# Altium PCB CW342_PCB.PcbDoc (part 2 of 3)
Units mil, origin at the board's own origin, x right, y up, seen from the top; angles counter-clockwise.
Board outline 3740.34 x 4080.75 mil, 4 copper layers (Top Layer, Layer 2 (GND), Layer 3, Bottom Layer), stack 23.756 mil thick; 89 components, 152 nets, 1082 pads, 424 vias.
Unrouted connection lines stored in the file: 58.
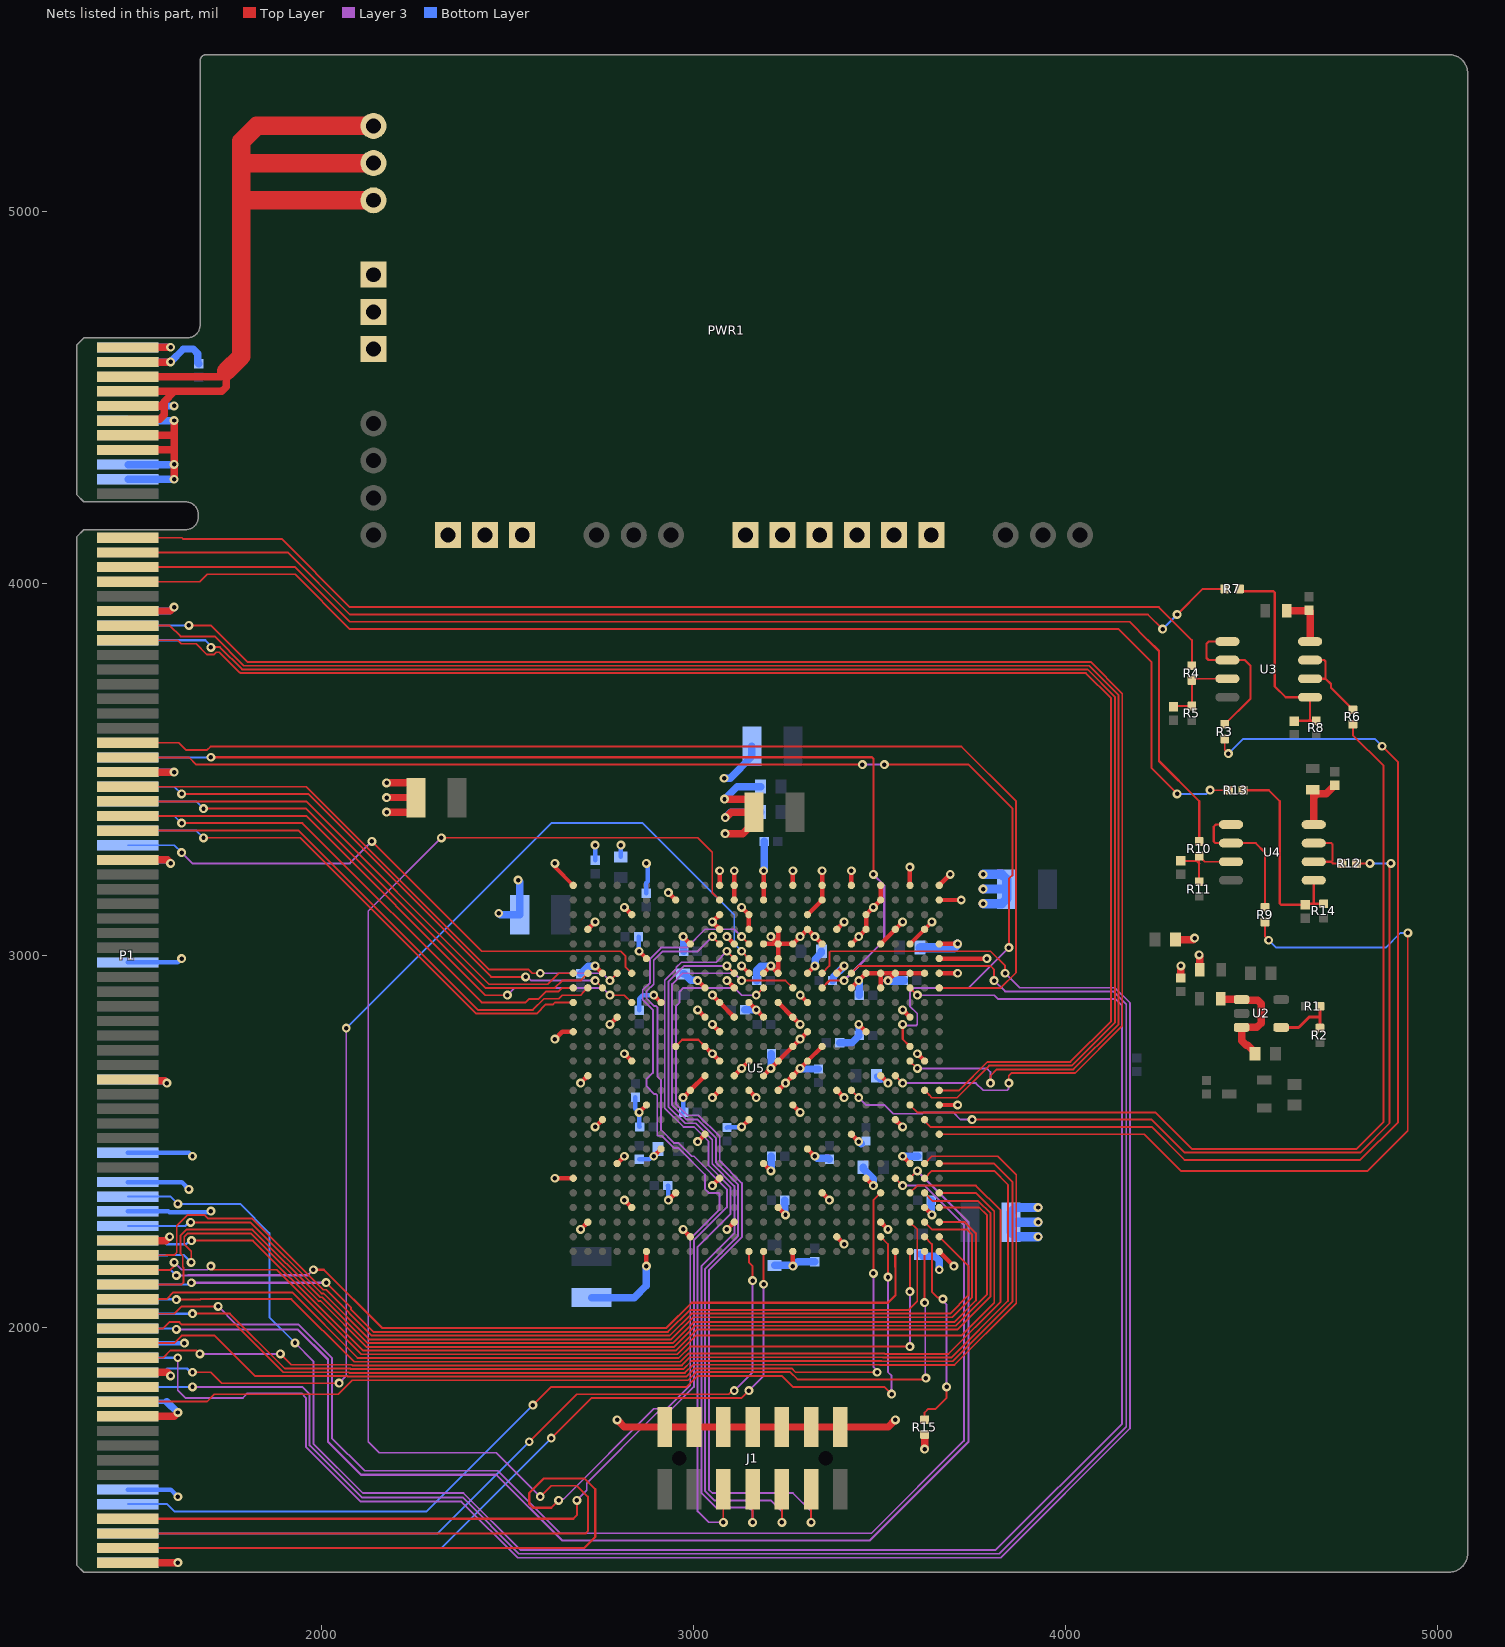
[diagram p4: the nets of this part, all layers, seen from the top]

## Via types
v1: diameter 24, hole 12, Top Layer to Bottom Layer, tented both sides, 423 vias
v2: diameter 24, hole 12, Top Layer to Bottom Layer, 1 vias

## Nets (pads, with @x,y where several pads share a name; then routed paths per layer and width w, separated by ;. In a path a pad name is that pad's centre, name@x,y a point inside that pad or via, vN(x,y) a via of type N, cw(c..) or ccw(c..) an arc to the next point about the centre after c; other vN are vias at no path point) (continued)
+5V: P1.B3 P1.B4 P1.B5 P1.B6 PWR1.1 PWR1.2 PWR1.3 | length 2584.5
  Top Layer w20: P1.B6@1480,4438.54 1483.78,4442.32 1565.61,4442.32 1577.33,4454.04 1577.33,4488.72 ; P1.B5@1480,4477.91 1480.09,4478 1481.09,4477 1565.61,4477 1577.33,4488.72 ; P1.B4@1480,4517.28 1605.08,4517.28 ; P1.B3@1480,4556.65 1729.65,4556.65 1744,4571 1744,4529 1732.28,4517.28 1605.08,4517.28 ; 1606.14,4517.28 1605.08,4517.28 ; 1577.33,4488.72 1577.33,4489.53 1605.08,4517.28
  Top Layer w50: 1744,4571 1785,4612 1785,5033 ; PWR1.3@2140,5031 1787,5031 1785,5033 ; PWR1.2@2140,5131 1792,5131 1785,5124 ; PWR1.1@2140,5231 1826.29,5231 1785,5189.71 1785,5124 ; 1785,5033 1785,5124
/USB_CE: P1.A81 U5.N26 | length 2235.4
  Top Layer w5: v1(2618.11,1702.76) 2725.91,1810.55 3129.45,1810.55 v1(3149.61,1830.71) ; v1(3188.98,2116.46) U5.N26@3188.98,2204.72
  Layer 3 w5: v1(3149.61,1830.71) 3188.98,1870.08 v1(3188.98,2116.46)
  Bottom Layer w5: P1.A81@1480,1407.05 2322.4,1407.05 v1(2618.11,1702.76)
/USB_RD: P1.A80 U5.P26 | length 2187.9
  Top Layer w5: v1(2559.06,1692.91) 2686.69,1820.55 3094.94,1820.55 3105.09,1830.71 v1(3110.24,1830.71) ; U5.P26@3149.61,2204.72 3149.61,2175.2 3159.45,2165.35 v1(3159.45,2126.3)
  Layer 3 w5: v1(3110.24,1830.71) 3159.45,1879.92 v1(3159.45,2126.3)
  Bottom Layer w5: P1.A80@1480,1446.42 2312.56,1446.42 v1(2559.06,1692.91)
AD0P: R6.2 U5.C16 | length 2455.6
  Top Layer w5: U5.C16@3582.68,2598.43 3602.36,2578.74 4242.13,2578.74 4340.55,2480.32 4783.46,2480.32 4856.02,2552.87 4856.02,3510.12 4773.62,3592.52 R6.2@4773.62,3622.05
AD1P: R3.2 U5.B17 | length 2871.7
  Top Layer w5: U5.B17@3622.05,2559.06 3622.05,2555.08 3637.76,2539.37 4232.28,2539.37 4320.87,2450.79 4793.31,2450.79 4895.02,2552.5 4895.02,3520.33 v1(4852.36,3562.99) ; R3.2@4429.13,3582.68 4429.13,3553.15 v1(4438.98,3543.31)
  Bottom Layer w5: v1(4438.98,3543.31) 4478.35,3582.68 4832.68,3582.68 v1(4852.36,3562.99)
AD3P: R12.2 U5.G15 | length 2344.1
  Top Layer w5: U5.G15@3425.2,2637.8 v1(3444.88,2618.11) ; v1(3750,2559.06) 4232.28,2559.06 4321.02,2470.32 4793.15,2470.32 4872.05,2549.21 4872.05,3244.56 v1(4875.52,3248.03) ; R12.2@4783.46,3248.03 v1(4819.52,3248.03)
  Layer 3 w5: v1(3444.88,2618.11) 3464.38,2598.61 3513.59,2598.61 3537.12,2575.08 3616.34,2575.08 3619.81,2578.56 3699.02,2578.56 3718.52,2559.06 v1(3750,2559.06)
  Bottom Layer w5: v1(4819.52,3248.03) v1(4875.52,3248.03)
AD8P: R9.2 U5.A18 | length 2328.7
  Top Layer w5: U5.A18@3661.42,2519.69 3750,2519.69 4212.6,2519.69 4311.02,2421.26 4812.99,2421.26 4921.26,2529.53 v1(4921.26,3061.02) ; R9.2@4537.4,3090.55 4537.4,3051.18 v1(4547.24,3041.34)
  Bottom Layer w5: v1(4547.24,3041.34) 4566.93,3021.65 4862.2,3021.65 4901.57,3061.02 v1(4921.26,3061.02)
CFG_CLK: P1.A57 U5.C8 | length 5184.1
  Top Layer w5: U5.C8@3582.68,2913.39 v1(3602.36,2893.7)
  Layer 3 w5: v1(1929.13,1958.66) 1978.5,1909.29 1978.5,1687.75 2111.14,1555.12 2381.89,1555.12 2535.01,1402 3813.42,1402 4153.23,1741.81 4153.23,2380.25 4153.23,2865.73 4135.1,2883.86 3818.9,2883.86 3809.06,2893.7 3639.78,2893.7 v1(3602.36,2893.7)
  Bottom Layer w5: P1.A57@1480,2351.93 1594.92,2351.93 v1(1614.17,2332.68) 1781.5,2332.68 1860.24,2253.94 1860.24,2027.56 v1(1929.13,1958.66)
CFG_D0: P1.A59 U5.B24 | length 2760.8
  Top Layer w5: v1(1648.19,2282.82) 1809.29,2282.82 2000.56,2091.55 2006,2091.55 2129.36,1968.19 2940.22,1968.19 2999.59,2027.56 3695.95,2027.56 3749.84,2081.45 3749.84,2249.26 3735.32,2263.78 3641.73,2263.78 U5.B24@3622.05,2283.46
  Bottom Layer w6: P1.A59@1480,2273.19 1633.69,2273.19 1643.32,2282.82 v1(1648.19,2282.82)
CFG_D1: P1.B61 U5.A25 | length 2716.1
  Top Layer w5: P1.B61@1480,2194.45 1582.04,2194.45 1582.29,2194.7 1604.15,2194.7 1611.32,2201.87 1611.32,2273.96 1639.68,2302.32 1685.85,2302.32 1694.68,2293.49 1812.76,2293.49 2004.7,2101.55 2012.63,2101.55 2135.98,1978.19 2936.07,1978.19 2995.44,2037.56 3691.1,2037.56 3739.84,2086.3 3739.84,2165.67 U5.A25@3661.42,2244.09
CFG_D2: P1.A60 U5.B22 | length 2933.5
  Top Layer w5: v1(1650.82,2233.82) 1815.86,2233.82 2016.58,2033.1 2017.72,2033.1 2112.63,1938.19 2952.64,1938.19 3009.16,1994.71 3710.03,1994.71 3799.37,2084.05 3799.37,2307.13 3766.33,2340.18 3644.08,2340.18 U5.B22@3622.05,2362.2
  Bottom Layer w6: P1.A60@1480,2233.82 1573.81,2233.82 1583.53,2224.09 1636.22,2224.09 1645.95,2233.82 v1(1650.82,2233.82)
CFG_D3: P1.B62 U5.A22 | length 2921.4
  Top Layer w5: P1.B62@1480,2155.08 1594.05,2155.08 1604.33,2165.35 v1(1604.33,2175.2) ; v1@1702.76,2155.51 1879.92,2155.51 2107.24,1928.19 2956.78,1928.19 3006.94,1978.35 3720.47,1978.35 3809.37,2067.24 3809.37,2312.68 3759.84,2362.2 U5.A22@3661.42,2362.2
  Layer 3 w5: v1(1604.33,2175.2) 1624.03,2155.5 1692.9,2155.5 v1(1702.76,2165.35)
CFG_D4: P1.A61 U5.A23 | length 2952.6
  Top Layer w5: v1(1650,2175) 1650,2204.82 1631.32,2223.5 1631.32,2243.9 1640.74,2253.32 1810.5,2253.32 1992.28,2071.55 1997.71,2071.55 2121.07,1948.19 2948.5,1948.19 3005.02,2004.71 3705.89,2004.71 3789.37,2088.19 3789.37,2302.99 3769.53,2322.83 U5.A23@3661.42,2322.83
  Bottom Layer w6: P1.A61@1480,2194.45 1585.77,2194.45 1586.52,2195.2 1629.8,2195.2 v1(1650,2175)
CFG_D5: P1.B63 U5.A24 | length 2892.3
  Top Layer w5: P1.B63@1480,2115.71 1623.58,2115.71 1629.5,2121.63 1629.5,2161.34 1627.43,2163.41 1627.43,2192.83 1621.32,2198.94 1621.32,2248.04 1636.6,2263.32 1814.65,2263.32 1996.42,2081.55 2001.86,2081.55 2125.21,1958.19 2944.36,1958.19 3000.88,2014.71 3701.75,2014.71 3759.84,2072.8 3759.84,2253.94 3730.32,2283.46 U5.A24@3661.42,2283.46
CFG_D6: P1.A62 U5.D26 | length 2295.7
  Top Layer w6: v1(1978.35,2155.51) 2006.6,2155.51 2163.42,1998.69 2927.58,1998.69 2995.82,2066.93 3523.62,2066.93 3543.62,2086.93 3543.62,2162.82 3543.31,2163.13 U5.D26@3543.31,2204.72
  Layer 3 w6: v1(1610,2140) 1641.72,2140 1642.24,2140.52 1963.36,2140.52 v1(1978.35,2155.51)
  Bottom Layer w6: P1.A62@1480,2155.08 1594.92,2155.08 v1(1610,2140)
CFG_D7: P1.B64 U5.C26 | length 2451.8
  Top Layer w5: P1.B64@1480,2076.34 1583.76,2076.34 1601.92,2094.5 1921.25,2094.5 2097.56,1918.19 2960.93,1918.19 2991.56,1948.82 v1(3582.68,1948.82) ; v1(3582.68,2096.46) 3582.68,2125.98 U5.C26@3582.68,2204.72
  Layer 3 w5: v1(3582.68,1948.82) v1(3582.68,2096.46)
CFG_D8_A0: P1.A63 U5.C24 | length 2438.2
  Top Layer w5: v1(2012.78,2121.05) 2079.56,2054.27 2079.56,2048.76 2140.13,1988.19 2931.93,1988.19 2991.3,2047.56 3579.75,2047.56 3602.36,2070.17 3602.36,2263.78 U5.C24@3582.68,2283.46
  Layer 3 w6: v1@1650,2120 v1(1650.52,2120.52) 2012.26,2120.52 v1(2012.78,2121.05)
  Bottom Layer w6: P1.A63@1480,2115.71 1645.71,2115.71 v1@1650,2120
CFG_D9_A1: P1.B65 U5.D21 | length 3555.3
  Top Layer w5: P1.B65@1480,2036.97 1603.9,2036.97 1624.02,2057.09 v1(1722.44,2057.09) ; U5.D21@3543.31,2401.57 v1(3562.99,2381.89)
  Layer 3 w5: v1(1722.44,2057.09) 1771.65,2007.87 1938.61,2007.87 2028.22,1918.27 2028.22,1702.76 2116.14,1614.83 2474.82,1614.83 2642.8,1446.85 3479.25,1446.85 3727.81,1695.42 3727.81,2276.13 3622.05,2381.89 v1(3562.99,2381.89)
CFG_D10_A2: P1.A64 U5.C22 | length 3010
  Top Layer w5: v1(1610,2075) 1673.85,2075 1675.44,2076.59 1919.48,2076.59 2087.87,1908.19 2965.07,1908.19 2986.96,1930.08 3513.94,1930.08 3514.7,1929.32 3686.29,1929.32 3826.26,2069.28 3826.26,2315.48 3759.84,2381.89 3602.36,2381.89 U5.C22@3582.68,2362.2
  Bottom Layer w6: P1.A64@1480,2076.34 1608.66,2076.34 v1(1610,2075)
CFG_D11_A3: P1.B66 U5.B20 | length 3150.7
  Top Layer w5: P1.B66@1480,1997.6 1574.37,1997.6 1591.27,2014.5 1618.08,2014.5 1624.7,2007.87 1769.3,2007.87 1897.28,1879.89 2073.74,1879.89 2075.45,1878.19 2977.49,1878.19 2999.38,1900.08 3501.51,1900.08 3502.27,1899.32 3702.31,1899.32 3868.27,2065.28 3868.27,2411.26 3818.9,2460.63 3641.73,2460.63 U5.B20@3622.05,2440.94
CFG_D12_A4: P1.A65 U5.A20 | length 3055.5
  Top Layer w5: v1(1653.54,2037.4) 1753.92,2037.4 1901.43,1889.89 2077.89,1889.89 2079.59,1888.19 2973.35,1888.19 2995.24,1910.08 3505.66,1910.08 3506.42,1909.32 3698.17,1909.32 3858.27,2069.42 3858.27,2391.73 3809.06,2440.94 U5.A20@3661.42,2440.94
  Bottom Layer w6: P1.A65@1480,2036.97 1480.43,2037.4 v1(1653.54,2037.4)
CFG_D13_A5: P1.B67 U5.E22 | length 2575.8
  Top Layer w5: P1.B67@1480,1958.23 1604.19,1958.23 1624.31,1978.35 1712.75,1978.35 1821.2,1869.89 2069.6,1869.89 2071.31,1868.19 2981.64,1868.19 3003.53,1890.08 3264.74,1890.08 3274.9,1879.92 v1(3494.09,1879.92) ; v1(3484.25,2145.67) 3484.25,2342.52 U5.E22@3503.94,2362.2
  Layer 3 w5: v1(3484.25,2145.67) 3484.25,1894.91 3494.09,1885.06 v1(3494.09,1879.92)
CFG_D14_A6: P1.A66 U5.C21 | length 3549.2
  Top Layer w5: U5.C21@3582.68,2401.57 v1(3602.36,2421.26)
  Layer 3 w6: v1(1610,1995) 1936.64,1995 2017.72,1913.92 2017.72,1692.91 2106.3,1604.33 2470.47,1604.33 2647.64,1427.17 3474.41,1427.17 3740.16,1692.91 3740.16,2283.46 v1(3602.36,2421.26)
  Bottom Layer w6: P1.A66@1480,1997.6 1607.4,1997.6 v1(1610,1995)
CFG_D15_A7: P1.B68 U5.B21 | length 3023.6
  Top Layer w5: P1.B68@1480,1918.86 1574.37,1918.86 1593.87,1938.36 1664,1938.36 v1(1673.23,1929.13) ; v1(1889.76,1929.13) 1919,1899.89 2082.03,1899.89 2083.73,1898.19 2969.21,1898.19 2991.1,1920.08 3509.8,1920.08 3510.56,1919.32 3694.03,1919.32 3846.28,2071.57 3846.28,2383.88 3808.9,2421.26 3641.73,2421.26 U5.B21@3622.05,2401.57
  Layer 3 w5: v1(1673.23,1929.13) v1(1889.76,1929.13)
CFG_DONE: P1.A68 U5.J7 | length 5286.4
  Top Layer w5: U5.J7@3346.46,2952.76 3366.14,2972.44 3366.14,3008.88 3369.07,3011.81 3799.21,3011.81 3838.58,2972.44 v1(3838.58,2952.76)
  Layer 3 w5: v1(1613.86,1918.86) 1613.86,1878.29 1613.99,1878.16 1613.99,1830.89 1633.86,1811.02 1789.27,1811.02 1801.1,1822.86 1946.67,1822.86 1958.5,1811.02 1958.5,1678.93 2105.43,1532 2376.72,1532 2527.72,1381 3826.24,1381 4174.24,1729 4174.24,2873 4133.54,2913.7 3877.64,2913.7 v1(3838.58,2952.76)
  Bottom Layer w6: P1.A68@1480,1918.86 v1(1613.86,1918.86)
CFG_DOUT: P1.B70
CFG_EMCCLK: P1.B71 U5.B26 | length 2530.3
  Top Layer w5: P1.B71@1480,1800.75 1692.48,1800.75 1712.6,1820.87 2045.77,1820.87 2083.09,1858.19 2985.78,1858.19 3007.67,1880.08 3260.6,1880.08 3280.26,1860.42 3622.09,1860.42 v1(3625.59,1863.92) ; v1(3622.05,2066.93) 3622.05,2125.98 U5.B26@3622.05,2204.72
  Layer 3 w5: v1(3622.05,2066.93) 3623.82,2065.16 3623.82,1865.69 v1(3625.59,1863.92)
CFG_INITB: P1.A70 U5.G7 | length 5035.4
  Top Layer w5: U5.G7@3425.2,2952.76 3444.88,2972.44 3799.21,2972.44 3809.06,2962.6 v1(3809.06,2933.07)
  Layer 3 w5: v1(1653.54,1840.55) 1948.82,1840.55 1968.5,1820.87 1968.5,1683.07 2108.45,1543.13 2379.74,1543.13 2530.87,1392 3823.1,1392 4164.24,1733.14 4164.24,2868.86 4129.4,2903.7 3838.43,2903.7 v1(3809.06,2933.07)
  Bottom Layer w5: P1.A70@1480,1840.12 1653.11,1840.12 v1(1653.54,1840.55)
CFG_PGM: P1.A69 U5.P6 | length 3059.2
  Top Layer w5: v1(1653.54,1879.92) 1702.76,1879.92 1732.28,1850.39 v1(2047.72,1850.39) ; v1(3129.92,3011.81) U5.P6@3149.61,2992.13
  Layer 3 w5: v1(2047.72,1850.39) 2047.72,1850.87 2066.93,1870.08 v1(2066.93,2805.12)
  Bottom Layer w5: v1(2066.93,2805.12) 2618.11,3356.3 2864.17,3356.3 3110.24,3110.24 3110.24,3031.5 v1(3129.92,3011.81)
  Bottom Layer w6: P1.A69@1480,1879.49 1480.43,1879.92 1576.05,1879.92 1586.2,1890.08 1638.52,1890.08 1648.67,1879.92 v1(1653.54,1879.92)
CFG_PUDC: R15.1 U5.B25 | length 558.3
  Top Layer w5: R15.1@3622.05,1751.97 3622.05,1771.65 3631.89,1781.5 3651.57,1781.5 3681.1,1811.02 v1(3681.1,1840.55) ; U5.B25@3622.05,2244.09 3641.73,2224.41 3641.73,2096.46 3657.78,2080.41 3667.62,2080.41 v1(3671.26,2076.77)
  Layer 3 w5: v1(3671.26,2076.77) 3671.26,2071.63 3681.1,2061.79 v1(3681.1,1840.55)
CFG_RDWR: P1.A78 U5.E25 | length 2668.1
  Top Layer w5: v1(2568.9,1791.34) 2618.11,1840.55 2982.28,1840.55 3011.81,1870.08 3238.19,1870.08 3267.72,1840.55 3513.78,1840.55 v1(3533.46,1820.87) ; U5.E25@3503.94,2244.09 3523.62,2224.41 v1(3523.62,2135.83)
  Layer 3 w5: v1(3523.62,2135.83) 3523.62,1879.92 3533.46,1870.08 v1(3533.46,1820.87)
  Bottom Layer w5: P1.A78@1480,1525.16 1585.08,1525.16 1604.33,1505.91 2283.46,1505.91 v1(2568.9,1791.34)
CWIO_HS1: P1.A27 U5.J8 | length 2727.3
  Top Layer w6: v1(1702.76,3533.46) 2586.88,3533.46 2587.2,3533.78 3480.42,3533.78 3484.25,3529.95 v1(3484.25,3218.5) ; U5.J8@3346.46,2913.39 3366.14,2933.07 v1(3405.51,2933.07)
  Layer 3 w6: v1(3405.51,2933.07) 3513.78,3041.34 3513.78,3188.97 v1(3484.25,3218.5)
  Bottom Layer w6: P1.A27@1480,3533.03 1702.32,3533.03 v1(1702.76,3533.46)
CWIO_HS2: P1.B27 U5.C12 | length 3337.7
  Top Layer w5: P1.B27@1480,3533.03 1644.13,3533.03 1663.39,3513.78 v1(3454.72,3513.78) ; v1(3513.78,3513.78) 3740.16,3513.78 3858.11,3395.83 3858.11,3215.98 3848.61,3206.48 v1(3848.61,3021.5) v1@3848.61,3016.35
  Top Layer w6: v1(3562.99,2814.96) 3562.99,2775.59 U5.C12@3582.68,2755.91
  Layer 3 w5: v1(3454.72,3513.78) v1(3513.78,3513.78) ; v1(3562.99,2814.96) 3565.92,2812.03 3599.43,2812.03 3602.36,2814.96 3602.36,2844.49 3582.68,2864.17 3582.68,2901.59 3594.47,2913.39 3740.5,2913.39 v1(3848.61,3021.5)
CWIO_IO4: P1.B26 U5.A8 | length 3145.1
  Top Layer w5: P1.B26@1480,3572.4 1616.56,3572.4 1635.62,3553.33 1693.1,3553.33 1702.1,3562.33 3721.13,3562.33 3868.11,3415.35 3868.11,2954.71 3826.79,2913.39 U5.A8@3661.42,2913.39
FPGA_M0: P1.B79 U5.T5 | length 3210.3
  Top Layer w5: 2677.17,1485.79 2687.01,1495.63 v1(2687.01,1535.43)
  Top Layer w6: P1.B79@1480,1485.79 2677.17,1485.79 ; v1(3051.18,3051.18) U5.T5@3070.87,3031.5
  Layer 3 w5: v1(2687.01,1535.43) 2713.69,1562.11 2713.69,1581.8 2903.54,1771.65 2933.07,1771.65 3001.81,1840.39 3001.81,2234.17 3090.55,2322.91 3090.55,2372.05 3001.97,2460.63 2996.43,2460.63 2960.9,2496.16 2948.7,2496.16 2913.18,2531.69 2913.18,2649.38 2913.2,2665.56 2903.54,2675.21 2903.54,2861.24 2900.61,2864.17 2895.65,2864.17 2874.2,2885.62 2874.2,2903.73 2893.7,2923.23 2893.7,2987.83 2917.53,3011.65 3011.65,3011.65 v1(3051.18,3051.18)
FPGA_M1: P1.B80 U5.T2 | length 4594.5
  Top Layer w5: v1(2322.83,3316.93) 3011.81,3316.93 3051.18,3277.56 3051.18,3169.29 U5.T2@3070.87,3149.61 ; v1(2588.58,1545.28) 2618.11,1574.8 2687.01,1574.8 2716.54,1545.28 2716.54,1452.24 2710.71,1446.42
  Top Layer w6: P1.B80@1480,1446.42 2710.71,1446.42
  Layer 3 w5: v1(2322.83,3316.93) 2125.98,3120.08 2125.98,1692.91 2155.51,1663.39 2470.47,1663.39 v1(2588.58,1545.28)
FPGA_M2: P1.B81 U5.P5 | length 3821
  Top Layer w5: v1(3129.92,3051.18) U5.P5@3149.61,3031.5
  Top Layer w6: P1.B81@1499.69,1407.05 2706.69,1407.05 2736.22,1436.58 2736.22,1564.96 2706.69,1594.49 2598.43,1594.49 2559.06,1555.12 2559.06,1525.59 2568.9,1515.75 2618.11,1515.75 2634.35,1531.99 v1(2637.8,1535.43)
  Layer 3 w5: v1(2637.8,1535.43) 2641.43,1539.07 2651.27,1539.07 2893.86,1781.65 2928.93,1781.65 2991.81,1844.54 2991.81,2239.02 3070.87,2318.07 3070.87,2359.28 3067.94,2362.2 3041.34,2362.2 3031.5,2372.05 3031.5,2411.42 2959.64,2483.27 2947.45,2483.27 2914.97,2515.75 2903.18,2515.75 2903.18,2625.02 2900.25,2627.95 2895.65,2627.95 2874.02,2649.59 2874.02,2667.32 2891.51,2684.82 2891.51,2854.17 2864.17,2881.51 2864.17,2903.54 ; 2864.2,2903.57 2864.2,2907.87 2883.7,2927.37 2883.7,2991.97 2913.39,3021.65 2982.28,3021.65 3031.5,3070.87 3110.24,3070.87 v1(3129.92,3051.18)
GND: C1.2 C21.2 C22.2 C23.2 C24.2 C25.2 C26.2 C27.2 C28.2 C29.2 C30.2 C31.2 C32.2 C33.2 C34.2 C35.2 C36.2 C37.2 C38.2 C39.2 C40.2 C41.2 C42.2 C43.2 C44.2 C45.2 C46.2 C47.2 C48.2 C49.2 C50.2 C51.2 C52.2 C53.2 C54.2 C55.2 C56.2 C57.2 C58.2 C59.2 C60.2 C61.2 C62.2 C63.2 C70.2 C71.2 C72.2 C73.2 C74.2 C75.2 J1.1 J1.3 J1.5 J1.7 J1.9 J1.11 J1.13 L2.1 P1.A1 P1.A2 P1.A5 P1.A6 P1.A9 P1.A10 P1.A17 P1.A28 P1.A34 P1.A41 P1.A49 P1.A54 P1.A56 P1.A58 P1.A67 P1.A71 P1.A77 P1.A82 P1.B1 P1.B2 P1.B7 P1.B8 P1.B17 P1.B28 P1.B34 P1.B49 P1.B60 P1.B69 P1.B72 P1.B82 PWR1.4 PWR1.5 PWR1.6 PWR1.11 PWR1.12 PWR1.13 PWR1.17 PWR1.18 PWR1.19 PWR1.20 PWR1.21 PWR1.22 R15.2 U5.A1 U5.A2 U5.A5 U5.A6 U5.A7 U5.A16 U5.A26 U5.AA6 U5.AA16 U5.AA26 U5.AB3 U5.AB13 U5.AB23 U5.AC10 U5.AC20 U5.AD7 U5.AD17 U5.AE4 U5.AE14 U5.AE24 U5.AF1 U5.AF11 U5.AF21 U5.B4 U5.B7 U5.B13 U5.B23 U5.C1 U5.C5 U5.C7 U5.C10 U5.C20 U5.D4 U5.D7 U5.D17 U5.E1 U5.E2 U5.E5 U5.E7 U5.E8 U5.E14 U5.E24 U5.F3 U5.F4 U5.F7 U5.F11 U5.F21 U5.G1 U5.G5 U5.G8 U5.G18 U5.H4 U5.H7 U5.H15 U5.H25 U5.J1 U5.J2 U5.J5 U5.J12 U5.J22 U5.K3 U5.K4 U5.K7 U5.K9 U5.K11 U5.K13 U5.K19 U5.L1 U5.L5 U5.L10 U5.L12 U5.L14 U5.L16 U5.L26 U5.M4 U5.M5 U5.M6 U5.M7 U5.M9 U5.M13 U5.M15 U5.M23 U5.N1 U5.N2 U5.N5 U5.N7 U5.N10 U5.N14 U5.N20 U5.P3 U5.P4 U5.P7 U5.P9 U5.P13 U5.P15 U5.P17 U5.R1 U5.R2 U5.R5 U5.R8 U5.R10 U5.R14 U5.R24 U5.T1 U5.T3 U5.T4 U5.T9 U5.T11 U5.T13 U5.T15 U5.T21 U5.U8 U5.U10 U5.U12 U5.U14 U5.U18 U5.V5 U5.V15 U5.V25 U5.W2 U5.W12 U5.W22 U5.Y9 U5.Y19 | length 13324.7
  Top Layer w6: U5.W12@2952.76,2755.91 2970.6,2773.75 3013.65,2773.75 U5.U12@3031.5,2755.91
  Top Layer w10: v1(2627.95,3248.03) 2627.95,3238.19 U5.AF1@2677.17,3188.98 ; v1(3129.92,2972.44) U5.P7@3149.61,2952.76
  Top Layer w12: C43.2@2234.35,3464.57 C43.2@2253.94,3444.98 ; v1(2627.95,2401.57) U5.AF21@2677.17,2401.57 ; v1(2627.95,2775.59) 2647.64,2795.28 U5.AF11@2677.17,2795.28 ; v1(2696.85,2263.78) U5.AE24@2716.54,2283.46 ; v1(2696.85,2657.48) U5.AE14@2716.54,2677.17 ; U5.AE4@2716.54,3070.87 v1(2736.22,3090.55) ; v1(2736.22,2539.37) U5.AD17@2755.91,2559.06 ; v1(2736.22,2972.44) U5.AD7@2755.91,2952.76 ; v1(2775.59,2814.96) U5.AC10@2795.28,2834.65 ; U5.AC20@2795.28,2440.94 v1(2814.96,2460.63) ; v1(2814.96,2342.52) U5.AB23@2834.65,2322.83 ; v1(2814.96,2736.22) U5.AB13@2834.65,2716.54 ; v1(2814.96,3129.92) U5.AB3@2834.65,3110.24 ; v1(2854.33,2578.74) U5.AA16@2874.02,2598.43 ; v1(2854.33,3011.81) U5.AA6@2874.02,2992.13 ; v1(2874.02,2165.35) U5.AA26@2874.02,2204.72 ; v1(2893.7,2460.63) U5.Y19@2913.39,2480.32 ; v1(2893.7,2893.7) U5.Y9@2913.39,2874.02 ; v1(2933.07,2342.52) U5.W22@2952.76,2362.2 ; v1(2933.07,3169.29) U5.W2@2952.76,3149.61 ; v1(2972.44,2263.78) U5.V25@2992.13,2244.09 ; v1(2972.44,3051.18) U5.V5@2992.13,3031.5 ; v1(2972.68,2618.11) 2972.68,2618.23 2992.13,2637.68 U5.V15@2992.13,2637.8 U5.U14@3031.5,2677.17 ; v1(3011.81,2500) U5.U18@3031.5,2519.69 ; v1(3011.81,2854.33) U5.U10@3031.5,2834.65 ; v1(3011.81,2933.07) U5.U8@3031.5,2913.39 ; U5.U12@3031.5,2755.91 v1(3051.18,2736.22) U5.T13@3070.87,2716.54 ; v1(3051.18,2381.89) U5.T21@3070.87,2401.57 ; v1(3051.18,2618.11) U5.T15@3070.87,2637.8 ; v1(3051.18,2814.96) U5.T11@3070.87,2795.28 ; v1(3051.18,2893.7) U5.T9@3070.87,2874.02 U5.R10@3110.24,2834.65 ; U5.T4@3070.87,3070.87 v1(3051.18,3090.55) U5.T3@3070.87,3110.24 ; U5.T1@3070.87,3188.98 v1(3070.87,3228.35) ; v1(3090.55,2263.78) U5.R24@3110.24,2283.46 ; v1(3090.55,2933.07) U5.R8@3110.24,2913.39 ; v1(3090.55,3051.18) U5.R5@3110.24,3031.5 ; U5.R14@3110.24,2677.17 v1(3129.92,2696.85) U5.P13@3149.61,2716.54 ; U5.R2@3110.24,3149.61 v1(3110.24,3228.35) ; v1(3129.92,2539.37) U5.P17@3149.61,2559.06 ; v1(3129.92,3129.92) U5.P3@3149.61,3110.24 U5.P4@3149.61,3070.87 ; U5.P15@3149.61,2637.8 v1(3169.29,2618.11) ; U5.P9@3149.61,2874.02 v1(3169.29,2854.33) U5.N10@3188.98,2834.65 ; U5.N20@3188.98,2440.94 v1(3208.66,2421.26) ; U5.N14@3188.98,2677.17 v1(3208.66,2696.85) U5.M13@3228.35,2716.54 U5.L12@3267.72,2755.91 v1(3287.4,2775.59) U5.K11@3307.09,2795.28 ; U5.N7@3188.98,2952.76 v1(3208.66,2972.44) U5.M7@3228.35,2952.76 U5.M5@3228.35,3031.5 ; U5.N5@3188.98,3031.5 U5.M5@3228.35,3031.5 ; U5.N2@3188.98,3149.61 v1(3188.98,3228.35) ; v1(3208.66,3051.18) U5.M5@3228.35,3031.5 ; U5.M23@3228.35,2322.83 v1(3248.03,2303.15) ; U5.M15@3228.35,2637.8 v1(3248.03,2657.48) U5.L14@3267.72,2677.17 v1(3287.4,2696.85) U5.K13@3307.09,2716.54 U5.J12@3346.46,2755.91 ; U5.M9@3228.35,2874.02 U5.L10@3267.72,2834.65 v1(3287.4,2814.96) ; U5.M4@3228.35,3070.87 U5.M5@3228.35,3031.5 ; v1(3267.72,2165.35) U5.L26@3267.72,2204.72 ; U5.L16@3267.72,2598.43 v1(3287.4,2578.74) ; U5.L1@3267.72,3188.98 v1(3267.72,3228.35) ; v1(3287.72,2893.7) 3287.72,2893.54 3307.09,2874.17 U5.K9@3307.09,2874.02 ; U5.K19@3307.09,2480.32 v1(3326.77,2460.63) ; U5.K7@3307.09,2952.76 v1(3326.77,2972.44) ; U5.K3@3307.09,3110.24 U5.J2@3346.46,3149.61 v1(3346.46,3228.35) ; U5.J22@3346.46,2362.2 v1(3366.14,2342.52) ; U5.J5@3346.46,3031.5 v1(3326.77,3051.18) U5.K4@3307.09,3070.87 v1(3287.4,3051.18) U5.L5@3267.72,3031.5 U5.M5@3228.35,3031.5 ; U5.H25@3385.83,2244.09 v1(3405.51,2224.41) ; U5.H15@3385.83,2637.8 v1(3405.51,2618.11) ; U5.H7@3385.83,2952.76 v1(3405.51,2972.44) ; U5.H4@3385.83,3070.87 v1(3405.51,3090.55) ; U5.G18@3425.2,2519.69 v1(3444.88,2500) ; U5.G8@3425.2,2913.39 v1(3444.88,2933.07) U5.F7@3464.57,2952.76 U5.E7@3503.94,2952.76 ; U5.G5@3425.2,3031.5 v1(3444.88,3051.18) U5.F4@3464.57,3070.87 U5.F3@3464.57,3110.24 v1(3484.25,3129.92) U5.E2@3503.94,3149.61 U5.E1@3503.94,3188.98 ; U5.G1@3425.2,3188.98 v1(3425.2,3228.35) ; v1(3444.88,2814.96) U5.F11@3464.57,2795.28 ; U5.F21@3464.57,2401.57 v1(3484.25,2381.89) ; U5.E24@3503.94,2283.46 v1(3523.62,2263.78) ; U5.E14@3503.94,2677.17 v1(3523.62,2657.48) ; U5.E8@3503.94,2913.39 U5.E7@3503.94,2952.76 ; U5.E5@3503.94,3031.5 v1(3562.99,3090.55) ; v1(3523.62,2933.07) U5.D7@3543.31,2952.76 ; U5.D17@3543.31,2559.06 v1(3562.99,2539.37) ; v1(3562.99,2460.63) U5.C20@3582.68,2440.94 ; v1(3562.99,2854.33) U5.C10@3582.68,2834.65 ; U5.C5@3582.68,3031.5 v1(3641.73,3090.55) ; U5.C1@3582.68,3188.98 v1(3582.68,3238.19) ; v1(3602.36,2736.22) U5.B13@3622.05,2716.54 ; U5.B23@3622.05,2322.83 v1(3641.73,2303.15) ; U5.B7@3622.05,2952.76 U5.E7@3503.94,2952.76 ; U5.A26@3661.42,2204.72 v1(3700.79,2165.35) ; U5.A16@3661.42,2598.43 v1(3710.63,2598.43) ; U5.A7@3661.42,2952.76 v1(3710.63,2952.76) ; U5.A6@3661.42,2992.13 v1(3789.37,2992.13) ; U5.A5@3661.42,3031.5 v1(3710.63,3031.5) ; U5.A2@3661.42,3149.61 v1(3720.47,3149.61) ; U5.A1@3661.42,3188.98 v1(3690.94,3218.5)
  Top Layer w20: P1.B82@1480,1367.68 1613.74,1367.68 v1(1614.17,1368.11) ; P1.B72@1480,1761.38 1603.9,1761.38 v1(1614.17,1771.65) ; P1.B69@1480,1879.49 1585.08,1879.49 v1(1594.49,1870.08) ; P1.B60@1480,2233.82 1581.54,2233.82 v1(1591.82,2244.09) ; P1.B49@1480,2666.89 1483.78,2663.11 1579.02,2663.11 v1(1584.65,2657.48) ; P1.B34@1480,3257.44 1585.08,3257.44 v1(1594.49,3248.03) ; P1.B28@1480,3493.66 v1(1603.9,3493.66) ; P1.B17@1480,3926.73 1594.05,3926.73 v1(1604.33,3937.01) ; P1.B8@1480,4359.8 1603.9,4359.8 ; P1.B7@1480,4399.17 1603.9,4399.17 1604.11,4399.39 ; P1.B2@1480,4596.02 1594.06,4596.02 v1(1594.49,4596.46) ; P1.B1@1480,4635.39 1594.06,4635.39 v1(1594.49,4635.83) ; v1(1603.9,4281.06) 1604.11,4281.28 1604.11,4399.39 ; 1604.33,4399.61 1604.11,4399.39 ; v1(1604.33,4438.98) 1604.11,4438.76 1604.11,4399.39 ; v1(2175.2,3385.83) 2238.35,3385.83 2253.94,3401.42 C43.2@2253.94,3425.2 ; v1(2175.2,3425.2) C43.2@2253.94,3425.2 ; v1(2175.2,3464.57) 2234.35,3464.57 2238.35,3464.57 2253.94,3448.98 2253.94,3444.98 C43.2@2253.94,3425.2 ; v1(2795.28,1751.97) 2814.57,1732.68 J1.13@2923.23,1732.68 J1.11@3001.97,1732.68 J1.9@3080.71,1732.68 J1.7@3159.45,1732.68 J1.5@3238.19,1732.68 J1.3@3316.93,1732.68 J1.1@3395.67,1732.68 3524.02,1732.68 v1(3543.31,1751.97) ; v1(3084,3421) 3147.8,3421 3163.39,3405.41 C55.2@3163.39,3385.83 ; v1(3085.63,3328.2) 3133.32,3328.2 3163.39,3358.27 C55.2@3163.39,3385.83 ; v1(3086,3371) 3087.08,3371 3101.91,3385.83 C55.2@3163.39,3385.83 ; v1(3622.05,1673.23) R15.2@3622.05,1712.6 ; C45.2@4296.56,3043 4344,3043 v1(4348,3047) ; C1.2@4311.02,2939.76 v1(4311.02,2972.44) ; v1(4360.24,3001.97) 4361.81,3000.39 L2.1@4361.81,2962.6
  Bottom Layer w5: v1(3444.88,2814.96) 3444.88,2787.01 3445.65,2786.24 C73.2@3446.46,2785.43
  Bottom Layer w12: P1.A77@1480,1564.53 1594.92,1564.53 1614.17,1545.28 v1(1614.17,1545.03) ; P1.A71@1480,1800.75 1584.65,1800.75 ; P1.A67@1480,1958.23 v1(1631.77,1958.23) ; P1.A58@1480,2312.56 1588.75,2312.56 1591.63,2309.68 1699.44,2309.68 v1(1702.76,2312.99) ; P1.A56@1480,2391.3 1624.45,2391.3 1643.7,2372.05 v1(1643.7,2371.8) ; P1.A54@1480,2470.04 1644.13,2470.04 v1(1653.54,2460.63) ; P1.A41@1480,2981.85 1613.74,2981.85 v1(1624.02,2992.13) ; C29.2@2736.22,3256.3 v1(2736.22,3297.24) ; C57.2@2805.12,3265.75 v1(2805.12,3297.24) ; C26.2@2844.49,2619.69 2844.49,2588.58 v1(2854.33,2578.74) 2855.12,2577.95 2855.12,2540.16 C59.2@2855.91,2539.37 ; C28.2@2852.76,3051.18 2853.54,3050.39 2853.54,3012.6 v1(2854.33,3011.81) ; C25.2@2854.33,2452.36 2882.19,2452.36 2890.45,2460.63 v1(2893.7,2460.63) ; C27.2@2854.33,2852.76 2854.33,2883.86 2863.7,2893.23 2893.23,2893.23 v1(2893.7,2893.7) ; C30.2@2874.02,3167.72 2874.02,3195.82 2877.33,3199.13 2877.33,3241.47 2874.02,3244.78 v1(2874.02,3248.03) ; C60.2@2931.5,2381.89 2932.28,2381.1 2932.28,2343.31 v1(2933.07,2342.52) ; v1(2972.68,2618.11) 2973.35,2617.44 2973.35,2579.41 C58.2@2974.02,2578.74 ; C41.2@3090.55,2537.8 3091.34,2538.58 3129.13,2538.58 v1(3129.92,2539.37) ; C75.2@3492.13,2677.17 3492.13,2673.23 3500.89,2664.46 3513.39,2664.46 3520.37,2657.48 v1(3523.62,2657.48)
  Bottom Layer w20: P1.A49@1480,2666.89 1483.78,2663.11 1577.93,2663.11 1583.56,2657.48 v1(1584.65,2657.48) ; P1.A34@1480,3257.44 1584,3257.44 1593.41,3248.03 v1(1594.49,3248.03) ; P1.A28@1480,3493.66 v1(1603.9,3493.66) ; P1.A17@1480,3926.73 1592.97,3926.73 1603.25,3937.01 v1(1604.33,3937.01) ; P1.A10@1480,4281.06 v1(1603.9,4281.06) ; P1.A9@1480,4320.43 1603.9,4320.43 v1(1604.33,4320.87) ; P1.A6@1480,4438.54 1603.9,4438.54 v1(1604.33,4438.98) ; P1.A5@1480,4477.91 1603.9,4477.91 v1(1604.33,4478.35) ; P1.A2@1480,4596.02 1480.22,4596.24 1594.27,4596.24 v1(1594.49,4596.46) 1629.18,4631.15 1655.17,4631.15 1667.4,4618.92 1667.4,4593.71 C44.2@1670,4591.11 ; P1.A1@1480,4635.39 1480.22,4635.61 1594.27,4635.61 v1(1594.49,4635.83) ; 1584.65,1800.75 1613.74,1771.65 v1(1614.17,1771.65) ; v1(2477,3114) 2480.76,3110.24 C36.2@2533.46,3110.24 2533.46,3198.54 v1(2529,3203) ; C40.2@2696.85,2951.18 2717.35,2971.68 2735.46,2971.68 v1(2736.22,2972.44) ; C56.2@2726.38,2080.71 2841.71,2080.71 2874.02,2113.02 v1(2874.02,2165.35) ; C34.2@2972.44,2950.79 2976.38,2950.79 2993.33,2933.84 3011.05,2933.84 v1(3011.81,2933.07) ; v1(2972.44,3051.18) 2972.44,3050.1 2974.02,3048.52 C61.2@2974.02,3011.81 ; v1(3083,3477) 3099.05,3477 3157.48,3535.43 C54.2@3157.48,3562.99 ; v1(3084,3421) 3117.72,3454.72 C52.2@3181.1,3454.72 ; v1(3086,3371) 3100.83,3385.83 C53.2@3181.1,3385.83 ; C62.2@3138.19,2854.33 v1(3169.29,2854.33) ; C48.2@3170.87,2933.07 3170.87,2960.73 3181.82,2971.68 3207.9,2971.68 v1(3208.66,2972.44) ; v1(3188.98,3228.35) 3188.98,3229.43 3190.55,3231 C46.2@3190.55,3307.09 ; v1(3208.66,2421.26) 3208.66,2422.34 3210.24,2423.92 C22.2@3210.24,2460.63 ; v1(3208.66,2696.85) 3208.66,2697.93 3210.24,2699.51 C51.2@3210.24,2736.22 ; C31.2@3218.5,2167.32 3264.67,2167.32 3266.63,2165.35 v1(3267.72,2165.35) 3268.8,2165.35 3280.22,2176.77 C38.2@3326.77,2176.77 ; C24.2@3246.46,2342.52 3246.46,2305.81 3248.03,2304.23 v1(3248.03,2303.15) ; v1(3287.4,2696.85) 3288.48,2696.85 3290.06,2695.28 C50.2@3336.61,2695.28 ; v1(3326.77,2460.63) 3327.85,2460.63 3333.52,2454.96 3363.54,2454.96 C39.2@3366.14,2452.36 ; v1(3326.77,2972.44) 3327.54,2973.21 3327.54,2990.92 3344.49,3007.87 C33.2@3344.49,3011.81 ; C47.2@3374.41,2933.07 3377.01,2935.67 3377.01,2942.85 3405.51,2971.36 v1(3405.51,2972.44) ; C49.2@3394.09,2765.75 3426.77,2765.75 3445.65,2784.62 3445.65,2786.24 3445.65,2814.2 v1(3444.88,2814.96) ; v1(3444.88,2500) 3445.96,2500 v1@3451.63,2494.33 ; v1(3444.88,2933.07) 3444.88,2931.99 3446.46,2930.41 C71.2@3446.46,2893.7 ; C42.2@3456.69,2431.1 3456.69,2427.17 3483.49,2400.37 3483.49,2382.66 v1(3484.25,2381.89) ; v1(3562.99,2460.63) C21.2@3603.94,2460.63 ; v1(3562.99,2539.37) v1@3562.99,2540.45 ; C32.2@3612.2,2196.85 3616.97,2192.09 3649.7,2192.09 3661.42,2180.37 v1(3661.42,2155.51) ; C23.2@3640.16,2342.52 3640.16,2305.81 3641.73,2304.23 v1(3641.73,2303.15)
  Bottom Layer w25: v1(3523.62,2933.07) C72.2@3564.57,2933.07 ; C74.2@3610.24,3021.65 3700.79,3021.65 v1(3710.63,3031.5) ; v1(3779.53,3139.76) 3829.43,3139.76 3842.52,3152.85 C70.2@3842.52,3179.13 ; v1(3779.53,3179.13) C70.2@3842.52,3179.13 ; v1(3779.53,3218.5) 3829.43,3218.5 3842.52,3205.41 C70.2@3842.52,3179.13 ; v1(3927.17,2244.09) 3867.42,2244.09 3854.33,2257.19 C37.2@3854.33,2283.46 ; v1(3927.17,2283.46) C37.2@3854.33,2283.46 ; v1(3927.17,2322.83) 3867.42,2322.83 3854.33,2309.74 C37.2@3854.33,2283.46
NetC2_1: C2.1 L1.2 U2.1 U2.3 | length 311.4
  Top Layer w20: L1.2@4418.5,2883.86 4419.49,2882.87 4473.43,2882.87 U2.1@4474.41,2881.89 4476.22,2880.08 4518.08,2880.08 4527,2871.16 4527,2818.8 4515.28,2807.09 U2.3@4474.41,2807.09 4474.41,2771.65 4487,2759.06 4490.94,2759.06 4509.84,2740.16 C2.1@4509.84,2736.22
NetC6_1: C6.1 R4.2 R5.1 U3.3 | length 216.1
  Top Layer w5: C6.1@4291.34,3669.68 4292.91,3671.26 R5.1@4340.55,3671.26 R4.2@4340.55,3740.16 4345.08,3744.68 U3.3@4436.02,3744.68
NetC7_1: C7.1 R7.2 R8.1 U3.5 | length 582.3
  Top Layer w6: R7.2@4468.5,3986.22 4474.95,3979.77 4560.02,3979.77 4563.54,3976.26 4563.54,3723.87 4592.72,3694.68 U3.5@4658.46,3694.68 4658.46,3634.84 4655.51,3631.89 ; C7.1@4616.14,3630.31 4617.72,3631.89 4655.51,3631.89 ; R8.1@4675.2,3631.89 4655.51,3631.89
NetC8_1: C8.1 L3.1 U3.8 | length 145.8
  Top Layer w20: L3.1@4595.67,3927.17 4596.46,3927.95 4654.72,3927.95 C8.1@4655.51,3928.74 4658.46,3925.79 U3.8@4658.46,3844.68
NetC9_1: C9.1 R10.2 R11.1 U4.3 | length 212.8
  Top Layer w5: R11.1@4360.24,3198.82 4360.24,3248.03 R10.2@4360.24,3267.72 4375.39,3252.56 U4.3@4445.87,3252.56
  Top Layer w6: C9.1@4311.02,3254.72 4353.54,3254.72 4360.24,3248.03
NetC10_1: C10.1 R13.2 R14.1 U4.5 | length 571
  Top Layer w6: R13.2@4478.35,3444.88 4547.24,3444.88 4576.77,3415.35 4576.77,3140.13 4580.29,3136.61 C10.1@4645.67,3136.61 4648.82,3139.76 4671.85,3139.76 ; U4.5@4668.31,3202.56 4668.31,3143.31 4671.85,3139.76 ; R14.1@4694.88,3139.76 4671.85,3139.76
NetC11_1: C11.1 L4.1 U4.8 | length 164.2
  Top Layer w20: L4.1@4665.35,3445.67 4665.71,3445.67 4668.31,3443.07 4668.31,3425.2 ; U4.8@4668.31,3352.56 4668.31,3425.2 ; C11.1@4724.41,3457.87 4701.57,3435.04 4678.15,3435.04 4668.31,3425.2
NetJ1_4: J1.4 U5.N8 | length 2134.4
  Top Layer w5: v1(3169.29,2893.7) U5.N8@3188.98,2913.39 ; v1(3316.93,1476.38) J1.4@3316.93,1564.96
  Layer 3 w5: 2953.18,2632.81 2953.18,2602.3 2984.43,2571.05 3013.96,2571.05 3071.02,2513.98 3071.02,2448.14 3130.55,2388.62 3130.55,2242.77 3041.81,2154.03 3041.81,1564.49 3051.18,1555.12 3267.72,1555.12 3316.93,1505.91 v1(3316.93,1476.38) ; 2953.2,2632.83 2953.2,2748.41 ; 2953.18,2748.44 2953.18,2864.02 2963.18,2874.02 2963.18,2903.54 2973.02,2913.39 3110.24,2913.39 3129.92,2893.7 v1(3169.29,2893.7)
NetJ1_6: J1.6 U5.L8 | length 2190.5
  Top Layer w5: v1(3129.92,2933.07) 3248.03,2933.07 U5.L8@3267.72,2913.39 ; v1(3238.19,1476.38) J1.6@3238.19,1564.96
  Layer 3 w5: 2943.18,2636.95 2943.18,2598.16 2981.97,2559.37 3011.5,2559.37 3061.02,2509.84 3061.02,2444 3120.55,2384.47 3120.55,2246.92 3031.81,2158.18 3031.81,1560.35 3056.72,1535.43 3208.66,1535.43 3238.19,1505.91 v1(3238.19,1476.38) ; 2943.2,2636.98 2943.2,2744.27 ; 2943.18,2744.3 2943.18,2923.49 2972.26,2952.57 3110.42,2952.57 v1(3129.92,2933.07)
NetJ1_8: J1.8 U5.R7 | length 1980
  Top Layer w5: v1(3090.55,2972.44) U5.R7@3110.24,2952.76 ; v1(3159.45,1476.38) J1.8@3159.45,1564.96
  Layer 3 w5: v1(3090.55,2972.44) 2975.53,2972.44 2933.18,2930.09 2933.18,2740.15 2933.2,2641.12 2933.18,2594.02 2977.83,2549.37 3006.11,2549.37 3051.02,2504.46 3051.02,2439.86 3110.55,2380.33 3110.55,2254.09 3021.81,2165.35 3021.81,1556.2 3062.27,1515.75 3149.61,1515.75 3159.45,1505.91 v1(3159.45,1476.38)
NetJ1_10: J1.10 U5.R6 | length 1954
  Top Layer w5: v1(3080.71,1476.38) J1.10@3080.71,1564.96 ; v1(3090.55,3011.81) U5.R6@3110.24,2992.13
  Layer 3 w5: v1(3080.71,1476.38) 3041.34,1476.38 3011.81,1505.91 3011.81,2217.34 3100.55,2306.08 3100.55,2376.19 3041.02,2435.72 3041.02,2500.32 3001.97,2539.37 2973.68,2539.37 2923.18,2589.88 2923.18,2645.24 2923.2,2735.99 2923.18,2934.23 2954.31,2965.37 2954.31,2968.46 2968.3,2982.44 3061.18,2982.44 v1(3090.55,3011.81)
NetR1_2: R1.2 R2.1 U2.4 | length 174.8
  Top Layer w8: U2.4@4580.71,2807.09 4627.95,2807.09 4655.51,2834.65 4685.04,2834.65 ; R2.1@4685.04,2805.12 4685.04,2834.65 ; R1.2@4685.04,2864.17 4685.04,2834.65
NetR3_1: R3.1 U3.1 U3.2 | length 409.6
  Top Layer w6: R3.1@4429.13,3622.05 4498.03,3690.94 4498.03,3779.53 4482.87,3794.68 U3.2@4436.02,3794.68 4385.6,3794.68 4379.92,3800.36 4379.92,3838.58 4386.02,3844.68 U3.1@4436.02,3844.68
NetR6_1: R6.1 U3.6 U3.7 | length 245.1
  Top Layer w6: U3.6@4658.46,3744.68 4700.2,3744.68 ; U3.7@4658.46,3794.68 4696.68,3794.68 4700.2,3791.17 4700.2,3744.68 ; R6.1@4773.62,3661.42 4714.57,3720.47 4714.57,3730.32 4700.2,3744.68
NetR9_1: R9.1 U4.1 U4.2 | length 385.8
  Top Layer w6: U4.1@4445.87,3352.56 4405.71,3352.56 4399.61,3346.46 4399.61,3307.09 4404.13,3302.56 U4.2@4445.87,3302.56 4512.4,3302.56 4537.4,3277.56 R9.1@4537.4,3129.92
NetR12_1: R12.1 U4.6 U4.7 | length 177.8
  Top Layer w6: U4.6@4668.31,3252.56 4715.58,3252.56 ; U4.7@4668.31,3302.56 4715.58,3302.56 4719.09,3299.04 4719.09,3256.07 4715.58,3252.56 ; R12.1@4744.09,3248.03 4720.11,3248.03 4715.58,3252.56
OT_ADC1: P1.B12 R4.1 | length 3043.4
  Top Layer w5: P1.B12@1480,4123.58 1624.97,4123.58 1628.05,4120.5 1893.28,4120.5 2076.77,3937.01 4251.97,3937.01 4340.55,3848.43 R4.1@4340.55,3779.53
OT_ADC2: P1.B13 R7.1 | length 3079.4
  Top Layer w5: P1.B13@1480,4084.21 1909.88,4084.21 2076.77,3917.32 4222.44,3917.32 v1(4261.81,3877.95)
  Top Layer w6: v1(4301.18,3917.32) 4370.08,3986.22 R7.1@4429.13,3986.22
  Bottom Layer w6: v1(4261.81,3877.95) v1(4301.18,3917.32)
OT_ANALOG0_ADC3: P1.B14 R10.1 | length 3422.2
  Top Layer w5: P1.B14@1480,4044.84 1929.57,4044.84 2076.77,3897.64 4173.23,3897.64 4222.44,3848.43
  Top Layer w6: 4222.44,3848.43 4251.97,3818.9 4251.97,3523.62 4360.24,3415.35 R10.1@4360.24,3307.09
OT_ANALOG1_ADC4: P1.B15 R13.1 | length 3383.1
  Top Layer w5: P1.B15@1480,4005.47 1672.79,4005.47 1692.73,4025.41 1929.32,4025.41 2076.77,3877.95 4143.7,3877.95 4232.28,3789.37 4232.28,3503.94 v1(4301.18,3435.04) ; v1(4389.76,3444.88) R13.1@4438.98,3444.88
  Bottom Layer w5: v1(4301.18,3435.04) 4379.92,3435.04 v1(4389.76,3444.88)
OT_IOA0: P1.A29 U5.AD8 | length 1500.1
  Top Layer w5: v1(1624.02,3434.79) 1964.45,3434.79 2456.33,2942.91 v1(2549.21,2942.91) ; v1(2736.22,2933.07) U5.AD8@2755.91,2913.39
  Layer 3 w5: v1(2549.21,2942.91) 2554.35,2942.91 2564.2,2933.07 v1(2736.22,2933.07)
  Bottom Layer w5: P1.A29@1480,3454.29 1604.76,3454.29 1624.02,3435.04 v1(1624.02,3434.79)
OT_IOA1: P1.B29 U5.AC7 | length 1539.3
  Top Layer w5: P1.B29@1480,3454.29 1959.09,3454.29 2450.97,2962.41 2557.29,2962.41 2566.95,2952.76 v1(2588.58,2952.76) ; v1(2775.59,2933.07) U5.AC7@2795.28,2952.76
  Layer 3 w5: v1(2588.58,2952.76) 2755.91,2952.76 v1(2775.59,2933.07)
OT_IOA2: P1.A30 U5.AE7 | length 1460.7
  Top Layer w5: v1(1683.07,3395.42) 1958.91,3395.42 2441.1,2913.23 2627.8,2913.23 2647.64,2933.07 2696.85,2933.07 2704.27,2940.49 U5.AE7@2716.54,2952.76
  Bottom Layer w5: P1.A30@1480,3414.92 1663.57,3414.92 v1(1683.07,3395.42)
OT_IOA3: P1.B30 U5.AF7 | length 1413.1
  Top Layer w5: P1.B30@1480,3414.92 1959.09,3414.92 2450.79,2923.23 2608.27,2923.23 2637.8,2952.76 U5.AF7@2677.17,2952.76
OT_IOA4: P1.A31 U5.AF8 | length 1421.1
  Top Layer w5: v1(1624.02,3356.3) 1948.82,3356.3 2430.92,2874.2 2549.4,2874.2 2559.06,2883.86 2584.28,2883.86 2603.65,2903.23 2637.48,2903.23 2647.64,2913.39 U5.AF8@2677.17,2913.39
  Bottom Layer w5: P1.A31@1480,3375.55 1604.76,3375.55 v1(1624.02,3356.3)
OT_IOA5: P1.B31 U5.AB9 | length 1559.2
  Top Layer w5: P1.B31@1499.69,3375.55 1596.01,3375.55 1596.26,3375.8 1958.85,3375.8 2440.94,2893.7 v1(2500,2893.7) ; v1(2775.59,2893.7) 2814.96,2893.7 U5.AB9@2834.65,2874.02
  Layer 3 w5: v1(2500,2893.7) 2519.68,2913.39 2755.91,2913.39 v1(2775.59,2893.7)
OT_IOA6: P1.A32 U5.AF9 | length 1413.2
  Top Layer w5: v1(1683.07,3316.93) 1943.28,3316.93 2415.87,2844.33 2578.58,2844.33 2603.27,2869.02 2622.95,2869.02 2627.95,2874.02 U5.AF9@2677.17,2874.02
  Bottom Layer w5: P1.A32@1480,3336.18 1663.82,3336.18 v1(1683.07,3316.93)
OT_IOA7: P1.B32 U5.AE8 | length 1460.8
  Top Layer w5: P1.B32@1480,3336.18 1674.75,3336.18 1674.99,3336.43 1938.79,3336.43 2420.89,2854.33 2568.9,2854.33 2598.58,2884.02 2637.95,2884.02 2647.64,2893.7 2696.85,2893.7 2704.27,2901.12 U5.AE8@2716.54,2913.39
OT_IOA8: P1.A33 U5.AB7 | length 1563.5
  Top Layer w5: v1(2135.83,3307.09) 2431.1,3011.81 2805.12,3011.81 2817.3,2999.63 2817.3,2970.1 U5.AB7@2834.65,2952.76
  Layer 3 w5: v1(1624.02,3277.31) 1653.3,3248.03 2076.77,3248.03 v1(2135.83,3307.09)
  Bottom Layer w5: P1.A33@1480,3296.81 1604.76,3296.81 1624.02,3277.56 v1(1624.02,3277.31)
OT_IOB0: P1.A18 U5.D14 | length 4359
  Top Layer w5: v1(1643.7,3887.8) 1703.07,3887.8 1801.18,3789.68 4068.27,3789.68 4153.54,3704.41 4153.54,2811.33 4026.43,2684.22 3855.48,2684.22 3848.43,2677.17 v1(3848.43,2657.48) ; U5.D14@3543.31,2677.17 v1(3562.99,2657.48)
  Layer 3 w5: v1(3562.99,2657.48) 3759.84,2657.48 3779.34,2637.98 3844.49,2637.98 3847.42,2640.91 3847.42,2651.33 v1@3850.17,2654.09
  Bottom Layer w6: P1.A18@1480,3887.36 1480.43,3887.8 v1(1643.7,3887.8)
OT_IOB1: P1.B18 U5.C13 | length 4305.4
  Top Layer w5: P1.B18@1480,3887.36 1592.31,3887.36 1621.41,3858.27 1712.76,3858.27 1791.34,3779.68 4064.13,3779.68 4143.54,3700.27 4143.54,2815.48 4022.29,2694.22 3816.27,2694.22 3799.21,2677.17 v1(3799.21,2657.48) ; U5.C13@3582.68,2716.54 v1(3602.36,2696.85)
  Layer 3 w5: v1(3602.36,2696.85) 3789.37,2696.85 3799.21,2687.01 v1(3799.21,2657.48)
OT_IOB2: P1.A19 U5.B15 | length 4199.1
  Top Layer w5: v1(1702.76,3828.93) 1703.39,3829.56 1727.14,3829.56 1787.01,3769.68 4059.99,3769.68 4133.54,3696.13 4133.54,2819.62 4018.14,2704.22 3795.26,2704.22 3709.15,2618.11 3641.73,2618.11 3634.31,2625.53 U5.B15@3622.05,2637.8
  Bottom Layer w6: P1.A19@1480,3847.99 1687.88,3847.99 1702.76,3833.12 v1(1702.76,3828.93)
OT_IOB3: P1.B19 U5.A15 | length 4120.7
  Top Layer w5: P1.B19@1480,3847.99 1613.74,3847.99 1623.15,3838.58 1663.39,3838.58 1692.54,3809.43 1710.83,3809.43 1717.11,3815.7 1725.81,3815.7 1780.56,3760.94 1781.61,3760.94 1782.87,3759.68 4055.85,3759.68 4123.54,3691.99 4123.54,2823.76 4014,2714.22 3791.12,2714.22 3714.69,2637.8 U5.A15@3661.42,2637.8